# Altium PCB PCB1.PcbDoc
Units mm, origin at the board's own origin, x right, y up, seen from the top; angles counter-clockwise.
Board outline 29.21 x 14.22 mm, 2 copper layers (Top Layer, Bottom Layer); 32 components, 23 nets, 126 pads, 52 vias.
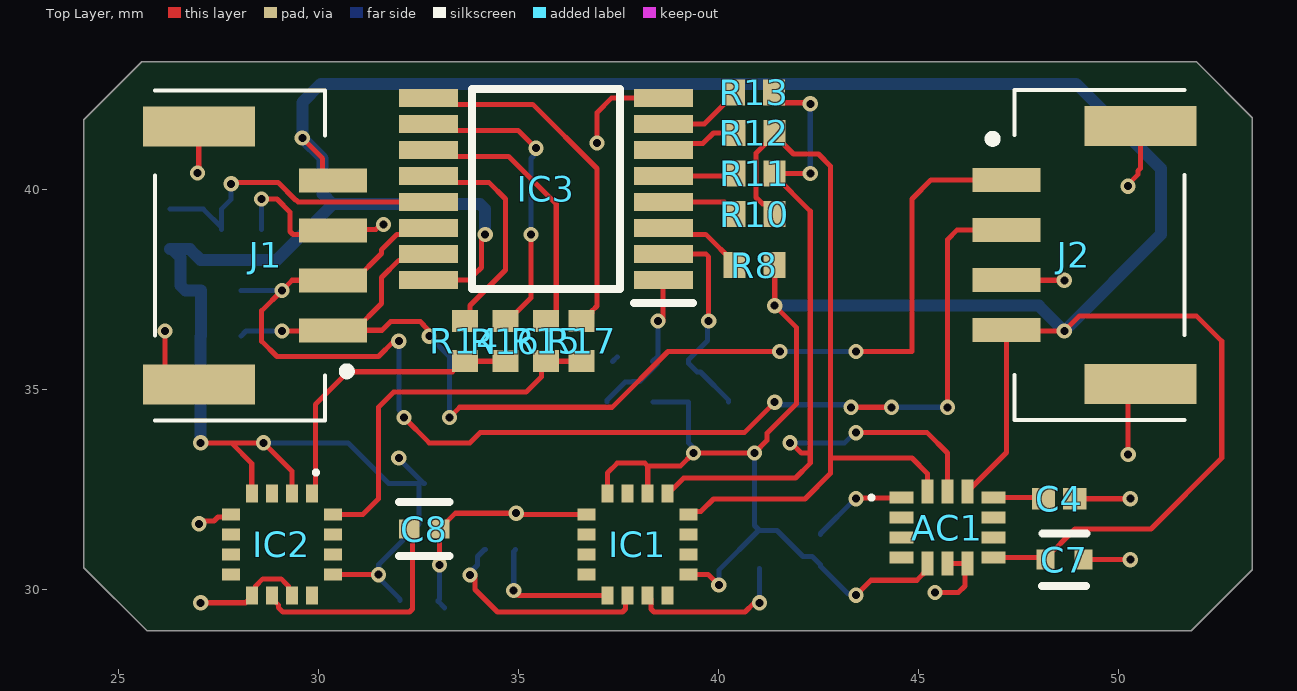
[diagram p0: Top Layer view]
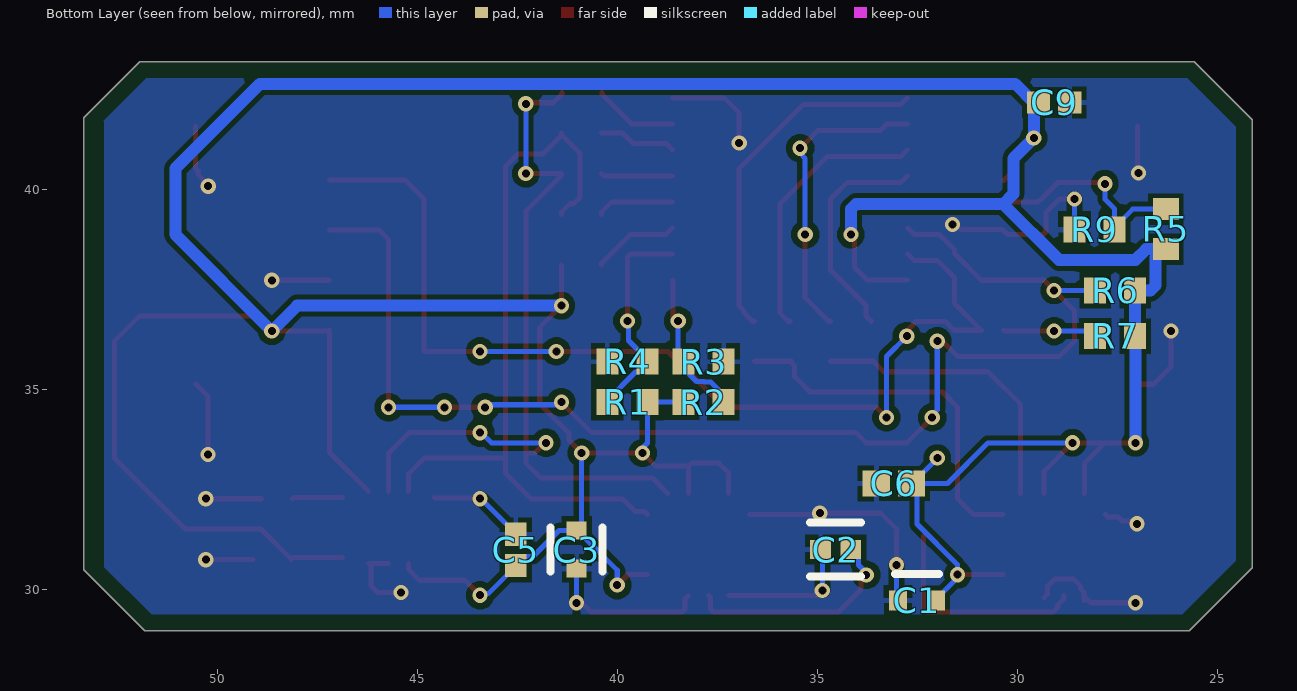
[diagram p1: Bottom Layer view, seen from below]

## Layer stack, top to bottom
Top Solder: solder mask 0.0102, Solder Resist, Dk 3.5
Top Layer: signal copper 0.0356
Dielectric 1: dielectric 0.32, FR-4, Dk 4.8
Bottom Layer: signal copper 0.0356
Bottom Solder: solder mask 0.0102, Solder Resist, Dk 3.5

## Board outline
24.13,30.533 24.13,41.73 25.58,43.18 51.943,43.18 53.34,41.783 53.34,30.48 51.816,28.956 25.707,28.956

## Design rules (kind name [scope] priority, off if disabled: settings)
BoardOutlineClearance [All] p1: gap=0.4 ignorepadtopadclearanceinfootprint=FALSE
Clearance [All] p1: gap=0.127 ignorepadtopadclearanceinfootprint=FALSE except(0.25: Arc-Hole Track-Hole SMDPad-Hole THPad-Hole Via-Hole Fill-Hole Poly-Hole Region-Hole Text-Hole)
ComponentClearance [All] p1: gap=0.127 collisioncheckmode=3 verticalgap=0.127 showdistances=TRUE
DiffPairsRouting [All] p1: maxlimit=0.254 minlimit=0.127 mostfreqgap=0.127 toplayer_minwidth=0.127 toplayer_maxwidth=25.4 toplayer_prefwidth=0.127 bottomlayer_minwidth=0.127 bottomlayer_maxwidth=25.4 bottomlayer_prefwidth=0.127 maxuncoupledlength=12.7
Height [All] p1: minheight=0 maxheight=1816.048 prefheight=12.7
HoleSize [All] p1: absolutevalues=TRUE maxlimit=6.3 minlimit=0.2 maxpercent=80.000 minpercent=20.000
HoleToHoleClearance [All] p1: gap=0.25 allowstackedmicrovias=FALSE
MinimumAnnularRing [All] p1: minimumring=0.076
MinimumSolderMaskSliver [All] p1: minsoldermaskwidth=0
PlaneClearance [All] p1: clearance=0.127
PlaneConnect PlaneConnectPowerPads [InPadClass('PowerPads')] p1: planeconnectstyle=Direct reliefexpansion=0.508 reliefentries=4 reliefconductorwidth=0.254 reliefairgap=0.254
PlaneConnect [All] p2: pad.planeconnectstyle=Relief pad.reliefexpansion=0.3 pad.reliefentries=4 pad.reliefconductorwidth=0.127 pad.reliefairgap=0.127 via.planeconnectstyle=Direct via.reliefexpansion=0.3 via.reliefentries=4 via.reliefconductorwidth=0.127 via.reliefairgap=0.127
PolygonConnect PolygonConnectPowerPads [All vs (InPadClass('PowerPads'))] p1: connectstyle=Direct reliefconductorwidth=0.254 reliefentries=4 polygonreliefangle="90 Angle" airgapwidth=0.254
PolygonConnect [All] p2: thpad.connectstyle=Relief thpad.reliefconductorwidth=0.127 thpad.reliefentries=4 thpad.polygonreliefangle="90 Angle" thpad.airgapwidth=0.127 smdpad.connectstyle=Relief smdpad.reliefconductorwidth=0.127 smdpad.reliefentries=4 smdpad.polygonreliefangle="90 Angle" smdpad.airgapwidth=0.127 via.connectstyle=Direct via.reliefconductorwidth=0.127 via.reliefentries=4 via.polygonreliefangle="90 Angle" via.airgapwidth=0.127
RoutingVias [All] p1: holewidth=0.3 width=0.6 viastyle="Through Hole" minholewidth=0.3 minwidth=0.6 maxholewidth=0.6 maxwidth=6.6
SilkToSilkClearance [All] p1: silktosilkclearance=0
SilkToSolderMaskClearance [IsPad] p1: minsilkscreentomaskgap=0.127 clearancetoexposedcopper=TRUE
SolderMaskExpansion [All] p1: expansion=0.075 istentingtop=FALSE
SupplyNets "Schematic Supply Nets_1" [InNet('3V3')] p1: voltage=0.000
SupplyNets "Schematic Supply Nets" [InNet('GND')] p2: voltage=0.000
Width [All] p1: maxlimit=25.4 minlimit=0.127 preferedwidth=0.127 minimp=50.000000 maximp=50.000000 favimp=50.000000
20 further rules are at their usual default settings.

## Components (designator, comment, footprint, x,y, rotation, side; value= is the part's Value field where it differs from the comment)
AC1 "ICM-20600" IIM42352 45.72,31.535 r0 top
C1 "2.2uF" FP-0402-L_1_0_0_10-W_0_5-MFG 32.512,29.718 r0 bottom
C2 "CL05A106MP8NUB8" FP-CL07-IPC_C 34.544,30.988 r0 bottom
C3 "2.2uF" FP-0402-L_1_0_0_10-W_0_5-MFG 41.021,30.988 r270 bottom
C4 "100 nF" CAPC1005X56X25LL10T15 48.514,32.258 r180 top
C5 "100 nF" CAPC1005X56X25LL10T15 42.545,30.979 r270 bottom
C6 "10 nF" CAPC1005X56X25NL10T15 33.088,32.639 r180 bottom
C7 "2.2uF" FP-0402-L_1_0_0_10-W_0_5-MFG 48.641,30.734 r0 top
C8 "CL05A106MP8NUB8" FP-CL07-IPC_C 32.639,31.496 r0 top
C9 "100 nF" CAPC1005X56X25LL10T15 29.083,42.164 r0 bottom
IC1 "MMC5983MA" MMC5983MA 37.973,31.115 r0 top
IC2 "MMC5983MA" MMC5983MA 29.083,31.115 r0 top
IC3 "TCA9546APWR" SOP65P640X120-16N 35.687,40.005 r180 top
J1 "BM04B-GHS-TBT_LF__SN__N_" BM04BGHSTBTLFSNN 28.403,38.344 r270 top
J2 "BM04B-GHS-TBT_LF__SN__N_" BM04BGHSTBTLFSNN 49.149,38.354 r90 top
R1 "DNP 00" RESC0402(1005)_N 39.751,34.671 r180 bottom value="2200.00 Ohm"
R2 "DNP 00" RESC0402(1005)_N 37.854,34.671 r0 bottom value="2200.00 Ohm"
R3 "DNP 00" RESC0402(1005)_N 37.846,35.687 r180 bottom value="2200.00 Ohm"
R4 "DNP 00" RESC0402(1005)_N 39.751,35.687 r180 bottom value="2200.00 Ohm"
R5 "DNP 00" RESC0402(1005)_N 26.289,38.997 r270 bottom value="2200.00 Ohm"
R6 "DNP 2K2" RESC0402(1005)_N 27.559,37.465 r180 bottom value="2200.00 Ohm"
R7 "DNP 2K2" RESC0402(1005)_N 27.559,36.322 r180 bottom value="2200.00 Ohm"
R8 "2K2" RESC0402(1005)_N 40.894,38.1 r0 top value="2200.00 Ohm"
R9 "DNP 00" RESC0402(1005)_N 28.075,38.989 r180 bottom value="2200.00 Ohm"
R10 "DNP 00" RESC0402(1005)_N 40.902,39.37 r180 top value="2200.00 Ohm"
R11 "DNP 00" RESC0402(1005)_N 40.902,40.386 r180 top value="2200.00 Ohm"
R12 "DNP 00" RESC0402(1005)_N 40.894,41.402 r180 top value="2200.00 Ohm"
R13 "DNP 00" RESC0402(1005)_N 40.886,42.418 r180 top value="2200.00 Ohm"
R14 "DNP 00" RESC0402(1005)_N 33.655,36.195 r90 top value="2200.00 Ohm"
R15 "DNP 00" RESC0402(1005)_N 35.687,36.195 r90 top value="2200.00 Ohm"
R16 "DNP 00" RESC0402(1005)_N 34.671,36.195 r90 top value="2200.00 Ohm"
R17 "DNP 00" RESC0402(1005)_N 36.576,36.195 r90 top value="2200.00 Ohm"

## Footprints (in the part's own frame and the unit in brackets; to place one, negate y for a bottom-side part, rotate by r counter-clockwise, add the part's x,y. Pads: shape width x height; smd on the part's side, far side on the other; paste and mask are expansions set on the pad)
BM04BGHSTBTLFSNN [mm]
  rect 0.6x1.7 smd: 1(1.875,1.95) 2(0.625,1.95) 3(-0.625,1.95) 4(-1.875,1.95)
  rect 1x2.8 smd: MP1(3.225,-1.4) MP2(-3.225,-1.4)
  silkscreen extent -4.13,-2.5 4.13,2.4, body extent -4.13,-2.7 4.13,2.74, height 4.15
CAPC1005X56X25LL10T15 [mm] "Chip Capacitor, 2-Leads, Body 1.00x0.50mm, IPC High Density"
  rect 0.58x0.54 smd: 1(-0.39,0) 2(0.39,0)
  body extent -0.55,-0.3 0.55,0.3, height 0.56
CAPC1005X56X25NL10T15 [mm] "Chip Capacitor, 2-Leads, Body 1.00x0.50mm, IPC Medium Density"
  rect 0.68x0.64 smd: 1(-0.44,0) 2(0.44,0)
  body extent -0.55,-0.3 0.55,0.3, height 0.56
FP-0402-L_1_0_0_10-W_0_5-MFG [mm]
  rect 0.45x0.5 smd paste+0 mask+0: 1(-0.475,0) 2(0.475,0)
  silkscreen extent -0.56,-0.65 0.54,-0.65, body extent -0.5,-0.25 0.5,0.25, height 0.6
FP-CL07-IPC_C [mm]
  rect 0.515x0.472 smd paste+0 mask+0: 1(-0.379,0) 2(0.379,0)
  silkscreen extent -0.64,-0.67 0.64,0.67, body extent -0.5,-0.25 0.5,0.25, height 0.55
IIM42352 [mm]
  rect 0.6x0.3 smd: 1(-1.15,0.75) 2(-1.15,0.25) 3(-1.15,-0.25) 4(-1.15,-0.75) 8(1.15,-0.75) 9(1.15,-0.25) 10(1.15,0.25) 11(1.15,0.75)
  rect 0.3x0.6 smd: 5(-0.5,-0.9) 6(0,-0.9) 7(0.5,-0.9) 12(0.5,0.9) 13(0,0.9) 14(-0.5,0.9)
  silkscreen extent -1.95,0.7 -1.85,0.8, body extent -1.5,-1.25 1.5,1.25, height 0.9
MMC5983MA [mm]
  rect 0.3x0.45 smd: 1(0.75,1.275) 2(0.25,1.275) 3(-0.25,1.275) 4(-0.75,1.275) 9(-0.75,-1.275) 10(-0.25,-1.275) 11(0.25,-1.275) 12(0.75,-1.275)
  rect 0.45x0.3 smd: 5(-1.275,0.75) 6(-1.275,0.25) 7(-1.275,-0.25) 8(-1.275,-0.75) 13(1.275,-0.75) 14(1.275,-0.25) 15(1.275,0.25) 16(1.275,0.75)
  body extent -1.5,-1.32 1.5,1.68, height 1
RESC0402(1005)_N [mm] "Chip Resistor, Body 1.0x0.5mm, IPC Medium Density"
  rect 0.55x0.65 smd: 1(-0.5,0) 2(0.5,0)
  body extent -0.52,-0.27 0.53,0.28, height 0.4
SOP65P640X120-16N [mm]
  rect 1.475x0.45 smd: 1(-2.938,2.275) 2(-2.938,1.625) 3(-2.938,0.975) 4(-2.938,0.325) 5(-2.938,-0.325) 6(-2.938,-0.975) 7(-2.938,-1.625) 8(-2.938,-2.275) 9(2.938,-2.275) 10(2.938,-1.625) 11(2.938,-0.975) 12(2.938,-0.325) 13(2.938,0.325) 14(2.938,0.975) 15(2.938,1.625) 16(2.938,2.275)
  silkscreen extent -3.67,-2.5 1.85,2.85, body extent -3.2,-2.5 3.2,2.5, height 1.13

## Part data
AC1: "Accelerometer", Manufacturer_Name=TDK, Mouser Part Number=410-ICM-20600, Arrow Part Number=ICM-20600, Arrow Price/Stock=null?region=nac, Datasheet Link=https://3cfeqx1hf82y3xcoull08ihx-wpengine.netdna-ssl.com/wp-content/uploads/2021/05/DS-000184-ICM-20600-v1.1.pdf, Manufacturer_Part_Number=ICM-20600, Mouser Price/Stock=https://www.mouser.co.uk/ProductDetail/TDK-InvenSense/ICM-20600?qs=u4fy%2FsgLU9MI5QhQvsMoRw%3D%3D
C1 C3 C7: library part CMP-14477-002382-2, "LMK105ABJ225MVHF", Case Code (Imperial)=0402, Case Code (Metric)=1005, Max Operating Temperature=85°C, Min Operating Temperature=-55°C, Ratings=AEC-Q200, Tolerance=20%, Voltage Rating=10V, Capacitance=2.2uF, Case/Package=0402, Halogen Free="Halogen Free", Lead Free="Lead Free", Length=0.039inch, Mount="Surface Mount", Packaging="Tape and Reel", RoHS Compliant=Yes, Thickness=0.024inch, Voltage Rating (DC)=10V, Width=0.02inch
C2 C8: library part CMP-13271-002778-1, "Cap Ceramic 10uF 10V X5R ±20% SMD 0402 +85°C Paper T/R", Capacitance=10uF, Case Code (Imperial)=0402, Case Code (Metric)=1005, Max Operating Temperature=85°C, Min Operating Temperature=-55°C, Tolerance=20%, Voltage Rating=10V, Case/Package=0402, Length=0.039inch, Mount="Surface Mount", Packaging="Tape and Reel", Thickness=0.035inch, Width=0.02inch
C4 C5 C9: library part CMP-2008-02972-1, "04023C104JAT2A", Manufacturer="AVX Interconnect / Elco", Part Number=04023C104JAT2A
C6: library part CMP-2008-02877-1, "0402ZD103KAT2A", Manufacturer="AVX Interconnect / Elco", Part Number=0402ZD103KAT2A
IC1 IC2: "Integrated Circuit", Manufacturer_Name=MEMSIC, Mouser Part Number=438-MMC5983MA, Arrow Part Number=MMC5983MA, Arrow Price/Stock=https://www.arrow.com/en/products/mmc5983ma/memsic.html?utm_currency=USD&region=europe, Datasheet Link=https://www.mouser.com/datasheet/2/821/Memsic_09102019_MMC5983MA_Datasheet_Rev_A-1635338.pdf, Height=1mm, Manufacturer_Part_Number=MMC5983MA, Mouser Price/Stock=https://www.mouser.co.uk/ProductDetail/MEMSIC/MMC5983MA?qs=B6kkDfuK7%2FD5qasHMdEt2g%3D%3D
IC3: "Integrated Circuit", Manufacturer_Name="Texas Instruments", Mouser Part Number=595-TCA9546APWR, Arrow Part Number=TCA9546APWR, Arrow Price/Stock=https://www.arrow.com/en/products/tca9546apwr/texas-instruments.html?utm_currency=USD&region=asia, Datasheet Link=http://www.ti.com/lit/gpn/tca9546a, Height=1.2mm, Manufacturer_Part_Number=TCA9546APWR, Mouser Price/Stock=https://www.mouser.co.uk/ProductDetail/Texas-Instruments/TCA9546APWR?qs=hNud%2FORuBR3YgtCnSrHnJg%3D%3D
J1 J2: "Connector", Arrow Part Number=BM04B-GHS-TBT(LF)(SN)(N), Manufacturer_Name="JST (JAPAN SOLDERLESS TERMINALS)", Mouser Part Number=N/A, Arrow Price/Stock=https://www.arrow.com/en/products/bm04b-ghs-tbt-lf-sn-n/jst-manufacturing.html?utm_currency=USD&region=asia, Datasheet Link=http://www.jst-mfg.com/product/pdf/eng/eGH.pdf, Height=4.05mm, Manufacturer_Part_Number=BM04B-GHS-TBT(LF)(SN)(N), Mouser Price/Stock=https://www.mouser.co.uk/ProductDetail/JST-Commercial/BM04B-GHS-TBTLFSNN?qs=QpmGXVUTftGHKxacCgPJ1g%3D%3D
R1 R2 R3 R4 R5 R6 R7 R8 R9 R10 R11 R12 R13 R14 R15 R16 R17: library part CMP-1011-00082-1, "2K2 0.063W 5% 0402 (1005 Metric)  SMD", Case-EIA=0402, Case-Metric=1005, Power="0.063 W", Tolerance="5 %", Technology=SMT

## Via types
v1: diameter 0.38, hole 0.2, Top Layer to Bottom Layer, 52 vias

## Nets (pads, with @x,y where several pads share a name; then routed paths per layer and width w, separated by ;. In a path a pad name is that pad's centre, name@x,y a point inside that pad or via, vN(x,y) a via of type N, cw(c..) or ccw(c..) an arc to the next point about the centre after c; other vN are vias at no path point)
3V3: AC1.5 AC1.8 AC1.12 C1.1 C3.1 C5.2 C6.2 C7.1 C9.2 IC1.2 IC1.4 IC1.13 IC2.2 IC2.4 IC2.13 IC3.16 J1.4 J2.4 R1.2 R2.2 R5.2 R6.2 R7.2 R8.2 | length 113.5
  Top Layer w0.127: v1(27.051,33.655) 27.813,33.655 ; IC2.4 28.327,32.396 28.327,33.141 27.813,33.655 ; IC2.2 29.333,32.946 v1(28.624,33.655) 27.813,33.655 ; v1(29.591,41.275) 30.099,40.767 30.099,40.455 30.335,40.219 J1.4 ; IC2.13 30.364,30.359 v1(31.496,30.359) ; IC3.16 33.758,37.73 33.993,37.964 33.998,37.964 34.072,38.039 34.072,38.771 v1(34.163,38.862) ; IC1.4 37.223,32.905 37.465,33.147 38.153,33.147 38.227,33.073 ; IC1.2 38.227,32.394 38.227,33.073 ; IC1.13 39.739,30.365 v1(40.005,30.099) ; R8.2 41.402,38.092 v1(41.402,37.084) 41.942,36.544 41.942,34.627 41.573,34.258 41.209,33.894 41.209,33.716 v1(40.894,33.401) v1(39.37,33.401) 39.042,33.073 38.227,33.073 ; v1(43.434,29.845) 43.808,30.219 44.954,30.219 45.22,30.485 AC1.5 ; AC1.12 47.199,33.415 J2.4 47.229,36.449 v1(48.641,36.449) 49.022,36.83 51.943,36.83 52.578,36.195 52.578,33.274 50.808,31.504 48.911,31.504 48.166,30.759 C7.1 48.115,30.785 AC1.8
  Bottom Layer w0.127: v1(28.624,33.655) 30.734,33.655 31.75,32.639 32.512,32.639 32.512,31.623 31.503,30.614 31.503,30.366 v1(31.496,30.359) 31.539,30.316 31.539,30.241 32.037,29.743 C1.1 ; v1(32.004,33.274) 32.004,33.263 32.628,32.639 C6.2 ; R2.2 R1.2 39.251,33.648 v1@39.498,33.401 ; v1(40.005,30.099) 40.005,30.472 40.996,31.463 C3.1 ; v1(40.894,33.401) 40.894,31.59 C3.1 ; v1(43.434,29.845) 43.386,29.893 43.221,29.893 42.545,30.569 C5.2 42.545,30.609 42.339,30.815 42.109,30.815 41.461,31.463 C3.1
  Bottom Layer w0.3: R5.2 R5.2@26.339,38.497 ; v1(27.051,33.655) 27.051,36.314 R7.2 R6.2 27.057,37.467 26.668,37.467 26.551,37.585 26.551,38.285 R5.2@26.339,38.497 ; v1(34.163,38.862) 34.163,39.497 34.036,39.624 30.353,39.624 ; v1(41.402,37.084) 48.006,37.084 v1(48.641,36.449) 51.054,38.862 51.054,40.513 48.937,42.63 30.057,42.63 29.591,42.164 v1(29.591,41.275) 30.099,40.767 30.099,39.878 30.353,39.624 ; R5.2@26.339,38.497 26.781,38.497 27.051,38.227 28.956,38.227 30.353,39.624
GND: AC1.1 AC1.6 AC1.7 C1.2 C2.2 C3.2 C4.1 C5.1 C6.1 C7.2 C8.2 C9.1 IC1.5 IC1.9 IC1.11 IC2.5 IC2.9 IC2.11 IC3.8 J1.3 J1.MP1 J1.MP2 J2.3 J2.MP1 J2.MP2 R3.2 R4.1 R9.1 | length 39.6
  Top Layer w0.127: v1(26.162,36.449) 26.162,35.556 26.599,35.119 J1.MP1 ; v1(26.974,40.401) 27.003,40.43 J1.MP2 ; v1(27.011,31.631) 27.08,31.7 27.382,31.7 27.482,31.8 27.743,31.8 IC2.5 ; v1(27.051,29.656) 28.171,29.656 IC2.9@28.329,29.814 ; IC2.9@28.329,29.718 IC2.9@28.329,29.814 ; v1(28.575,39.751) 28.956,39.751 29.284,39.423 29.284,38.935 29.359,38.861 30.245,38.861 30.373,38.989 31.428,38.989 31.555,39.116 v1(31.623,39.116) ; IC2.11@29.329,29.793 29.246,29.876 29.246,30.071 29.174,30.144 29.062,30.255 28.604,30.255 28.419,30.071 28.419,30.001 28.329,29.911 IC2.9@28.329,29.814 ; v1(33.02,30.607) 33.02,31.494 C8.2 33.417,31.895 v1(34.94,31.895) 34.97,31.865 IC1.5 ; v1(34.878,29.962) 34.999,29.84 IC1.9 ; v1(36.957,41.148) 36.957,41.909 37.328,42.28 IC3.8 ; IC1.11 38.309,29.753 38.309,29.499 38.384,29.424 40.661,29.424 40.893,29.656 v1(41.021,29.656) ; v1(43.434,32.258) 43.448,32.272 44.556,32.272 AC1.1 ; v1(45.41,29.91) 45.993,29.91 46.157,30.075 46.157,30.573 AC1.7 AC1.6 ; J2.3 47.209,37.719 v1(48.641,37.719) ; C4.1 v1(50.292,32.258) ; C7.2 v1(50.292,30.734) ; v1(50.231,40.071) 50.231,40.109 50.481,40.359 50.481,40.449 50.549,40.517 J2.MP1 ; v1(50.238,33.362) 50.238,34.818 J2.MP2
  Bottom Layer w0.127: R9.1 v1(28.575,39.751) ; C1.2@32.987,29.693 C1.2@33.149,29.532 ; C1.2 33.02,29.751 v1(33.02,30.607) ; v1(34.878,29.962) 34.878,30.943 C2.2 ; R3.2 R3.2@37.465,35.806 ; v1(41.021,29.656) C3.2 ; C5.1 42.545,31.389 43.414,32.258 v1(43.434,32.258)
I2C_SCL: IC3.14 J1.2 J2.2 R6.1 | length 32.6
  Top Layer w0.127: v1(32.004,36.195) 31.876,36.195 31.495,35.814 28.956,35.814 28.575,36.195 28.575,36.957 v1(29.083,37.465) 29.337,37.719 30.903,37.719 31.572,38.388 31.572,38.48 31.96,38.868 32.587,38.868 IC3.14 ; v1(32.131,34.29) 32.766,33.655 33.782,33.655 34.036,33.909 40.64,33.909 v1(41.402,34.671) ; v1(43.307,34.544) v1(44.323,34.544) ; v1(45.72,34.544) 45.72,38.735 45.964,38.979 J2.2
  Bottom Layer w0.127: R6.1 v1(29.083,37.465) ; v1(32.004,36.195) 32.004,34.477 32.131,34.35 v1(32.131,34.29) ; v1(41.402,34.671) 41.465,34.608 v1@43.307,34.608 ; v1(44.323,34.544) v1(45.72,34.544)
I2C_SDA: IC3.15 J1.1 J2.1 R7.1 | length 28.4
  Top Layer w0.127: v1(29.083,36.449) 30.333,36.449 J1.1 ; IC3.15 32.587,38.218 32.006,38.218 31.573,37.785 31.573,37.139 30.903,36.469 31.584,36.469 31.801,36.685 32.541,36.685 32.615,36.611 32.615,36.601 32.766,36.45 v1(32.766,36.322) ; v1(33.274,34.29) 33.528,34.544 37.338,34.544 38.735,35.941 v1(41.529,35.941) ; v1(43.434,35.941) 44.831,35.941 44.831,39.751 45.309,40.229 J2.1
  Bottom Layer w0.127: R7.1 28.186,36.449 v1(29.083,36.449) ; v1(32.766,36.322) 33.274,35.814 v1(33.274,34.29) ; v1(41.529,35.941) v1(43.434,35.941)
MAG1_IMU_SCL: AC1.13 IC1.1 R11.1 R13.1 | length 21
  Top Layer w0.127: IC1.1@38.735,32.385 39.125,32.775 41.919,32.775 42.291,33.147 42.291,33.401 ; R13.1 41.386,42.368 41.598,42.156 42.264,42.156 v1(42.291,42.13) ; v1(41.783,33.655) 41.813,33.655 42.067,33.401 42.291,33.401 ; v1(42.291,40.386) R11.1 41.402,40.336 42.291,39.447 42.291,33.401 ; v1(43.434,33.909) 45.212,33.909 45.72,33.401 AC1.13
  Bottom Layer w0.127: v1(41.783,33.655) 43.15,33.655 43.404,33.909 v1(43.434,33.909) ; v1(42.291,40.386) v1(42.291,42.13)
MAG1_IMU_SDA: AC1.14 IC1.16 R10.1 R12.1 | length 18.9
  Top Layer w0.127: IC1.16 39.325,31.942 39.562,31.942 39.87,32.25 42.156,32.25 42.799,32.893 42.799,33.274 ; R12.1 R12.1@41.394,41.352 ; R10.1 41.402,39.42 41.19,39.632 41.095,39.632 40.936,39.79 40.936,40.894 R12.1@41.394,41.352 ; AC1.14 45.22,32.885 44.831,33.274 42.799,33.274 ; R12.1@41.394,41.352 41.869,40.876 42.494,40.876 42.799,40.572 42.799,33.274
MAG1_SCL_X: IC3.7 R13.2 | length 2.1
  Top Layer w0.127: IC3.7 39.648,41.63 40.386,42.368 R13.2
MAG1_SCL_Y: IC3.5 R11.2 | length 1.8
  Top Layer w0.127: IC3.5 40.346,40.33 R11.2
MAG1_SDA_X: IC3.6 R12.2 | length 1.9
  Top Layer w0.127: IC3.6 38.787,41.142 39.61,41.142 39.871,41.402 R12.2
MAG1_SDA_Y: IC3.4 R10.2 | length 1.9
  Top Layer w0.127: IC3.4 40.142,39.68 40.402,39.42 R10.2
MAG2_SCL: IC2.1 R14.1 R16.1 | length 7.4
  Top Layer w0.127: IC2.1@29.92,32.39 29.92,34.619 30.734,35.433 33.343,35.433 33.605,35.695 R14.1 R16.1
MAG2_SCL_X: IC3.10 R16.2 | length 7.6
  Top Layer w0.127: IC3.10 33.262,41.63 33.423,41.468 34.986,41.468 v1(35.433,41.021) ; R16.2 34.721,36.695 35.306,37.28 v1(35.306,38.862)
  Bottom Layer w0.127: v1(35.306,38.862) 35.306,40.766 35.433,40.893 v1(35.433,41.021)
MAG2_SCL_Y: IC3.12 R14.2 | length 5.6
  Top Layer w0.127: IC3.12 32.911,40.168 34.254,40.168 34.671,39.751 34.671,37.973 33.784,37.086 33.784,36.824 R14.2
MAG2_SDA: IC2.16 R15.1 R17.1 | length 9.3
  Top Layer w0.127: IC2.16 31.103,31.865 31.496,32.258 31.496,34.544 31.875,34.923 35.189,34.923 35.57,35.304 35.57,35.578 R15.1 ; R15.1@35.645,35.695 R15.1 ; R17.1 R15.1
MAG2_SDA_X: IC3.9 R17.2 | length 8.9
  Top Layer w0.127: IC3.9 32.911,42.118 35.352,42.118 36.957,40.513 36.957,37.076 36.837,36.957 36.837,36.907 36.626,36.695 R17.2
MAG2_SDA_Y: IC3.11 R15.2 | length 6.8
  Top Layer w0.127: IC3.11 32.911,40.818 34.747,40.818 35.941,39.624 35.941,36.907 35.729,36.695 R15.2
NetAC1_11: AC1.11 C4.2 | length 1.3
  Top Layer w0.127: AC1.11 48.096,32.286 C4.2
NetC2_1: C2.1 IC1.10 | length 5.6
  Top Layer w0.127: v1@33.909,30.353 33.909,29.989 34.474,29.424 37.599,29.424 37.674,29.499 37.674,29.791 IC1.10
  Bottom Layer w0.127: v1(33.782,30.353) 33.782,30.413 33.971,30.603 33.971,30.815 34.144,30.988 C2.1
NetC8_1: C8.1 IC2.10 | length 5.7
  Top Layer w0.127: IC2.10 28.833,29.765 28.992,29.605 28.992,29.536 29.104,29.424 32.271,29.424 32.345,29.499 32.345,31.323 32.3,31.369 C8.1@32.258,31.369
NetIC3_1: IC3.1 R2.1 R3.1 | length 3.8
  Top Layer w0.127: v1@38.608,36.703 38.608,37.713 IC3.1
  Bottom Layer w0.127: R2.1@37.211,34.671 37.211,34.721 37.662,35.172 37.827,35.172 37.842,35.187 38.022,35.187 38.473,35.637 R3.1@38.473,35.687 ; R3.1 38.481,35.822 v1(38.481,36.703)
NetIC3_2: IC3.2 R1.1 R4.2 | length 5.4
  Top Layer w0.127: IC3.2 39.677,38.38 39.751,38.306 v1(39.751,36.703)
  Bottom Layer w0.127: R4.2 39.251,35.637 39.462,35.426 39.546,35.426 40.251,34.721 R1.1 ; R4.2@39.251,35.737 39.726,36.213 39.726,36.678 v1(39.751,36.703)
NetIC3_3: IC3.3 R8.1 | length 2.2
  Top Layer w0.127: IC3.3 38.787,38.868 39.676,38.868 40.394,38.15 R8.1
NetIC3_13: IC3.13 R5.1 R9.2 | length 7.9
  Top Layer w0.127: v1(27.813,40.132) 27.845,40.164 28.988,40.164 29.424,39.729 29.436,39.729 29.485,39.68 IC3.13
  Bottom Layer w0.127: R5.1 27.117,39.497 R9.2@27.575,39.039 ; R9.2 R9.2@27.575,39.039 ; v1(27.813,40.132) 27.813,39.743 27.575,39.505 R9.2@27.575,39.039
pads on no net: AC1.2 AC1.3 AC1.4 AC1.9 AC1.10 IC1.3 IC1.6 IC1.7 IC1.8 IC1.12 IC1.14 IC1.15 IC2.3 IC2.6 IC2.7 IC2.8 IC2.12 IC2.14 IC2.15

## Polygon pours and split planes (outlines as drawn)
GND on Bottom Layer "GND_L02_P004" (solid, remove dead copper, pour order 4): 23.622,31.041 23.622,43.18 53.209,43.18 52.832,41.656 52.832,30.406 51.382,28.956 25.707,28.956